# Allegro board F29_PHASE_COUPON.brd
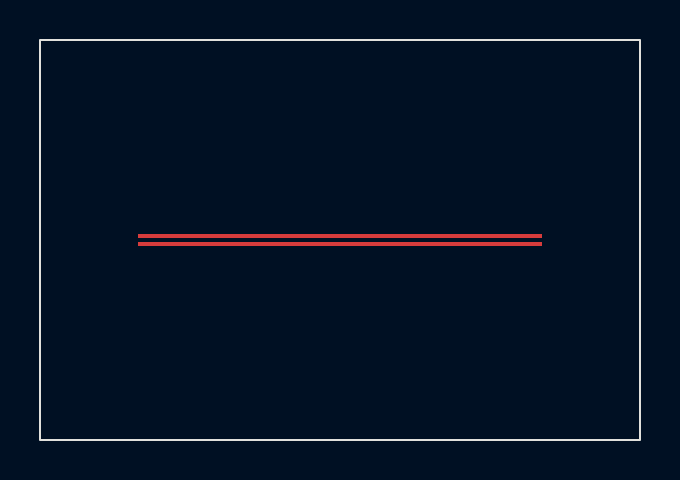
[diagram p0: board, top side]
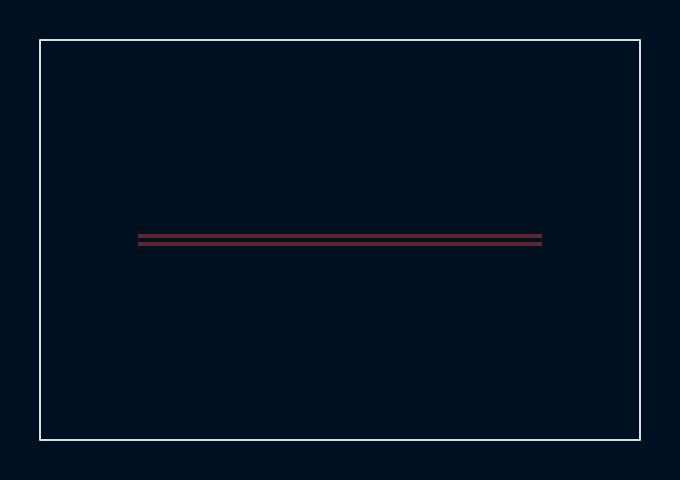
[diagram p1: board, bottom side, seen from below]

Outline 30 x 20 mm; copper layers: TOP, BOTTOM. Coordinates in mm from the lower left corner of the outline.
Outline path: rectangle 0,0 30,20

## Design rules (mm)
net group DP_CALIBRATION: nets CAL_N CAL_P

## Placement (name value [footprint] x y rotation side)
J901  VALUE  [F29_PAIR_ENDPOINT]  5 10 0 top
J902  VALUE  [F29_PAIR_ENDPOINT]  25 10 0 top

## Library data of the parts
J901 J902 = F29_PAIR_ENDPOINT

## Footprints (pads in the part's own frame, mm; a bottom-side part is the same pattern mirrored in y, then rotated)
F29_PAIR_ENDPOINT
  rect 0.2x0.2 smd: 1(0,0.2) 2(0,-0.2)

## Nets
CAL_N: J901.2(N) J902.2(N)
CAL_P: J901.1 J902.1

## Routing (per net, layer and track width the routed paths; a pad name or vN(x,y) marks a point on that pad's centre or on a via; arc(x,y) is an arc through that point)
CAL_N: length 20
  TOP w0.2: J901.2 J902.2
CAL_P: length 20
  TOP w0.2: J901.1 J902.1
